# Altium PCB Sound_Sensor_v3.1.PcbDoc (part 1 of 3)
Units mm, origin at the board's own origin, x right, y up, seen from the top; angles counter-clockwise.
Board outline 69.99 x 68.25 mm, 2 copper layers (Top Layer, Bottom Layer), stack 1.448 mm thick; 83 components, 60 nets, 303 pads, 87 vias.
Unrouted connection lines stored in the file: 2.
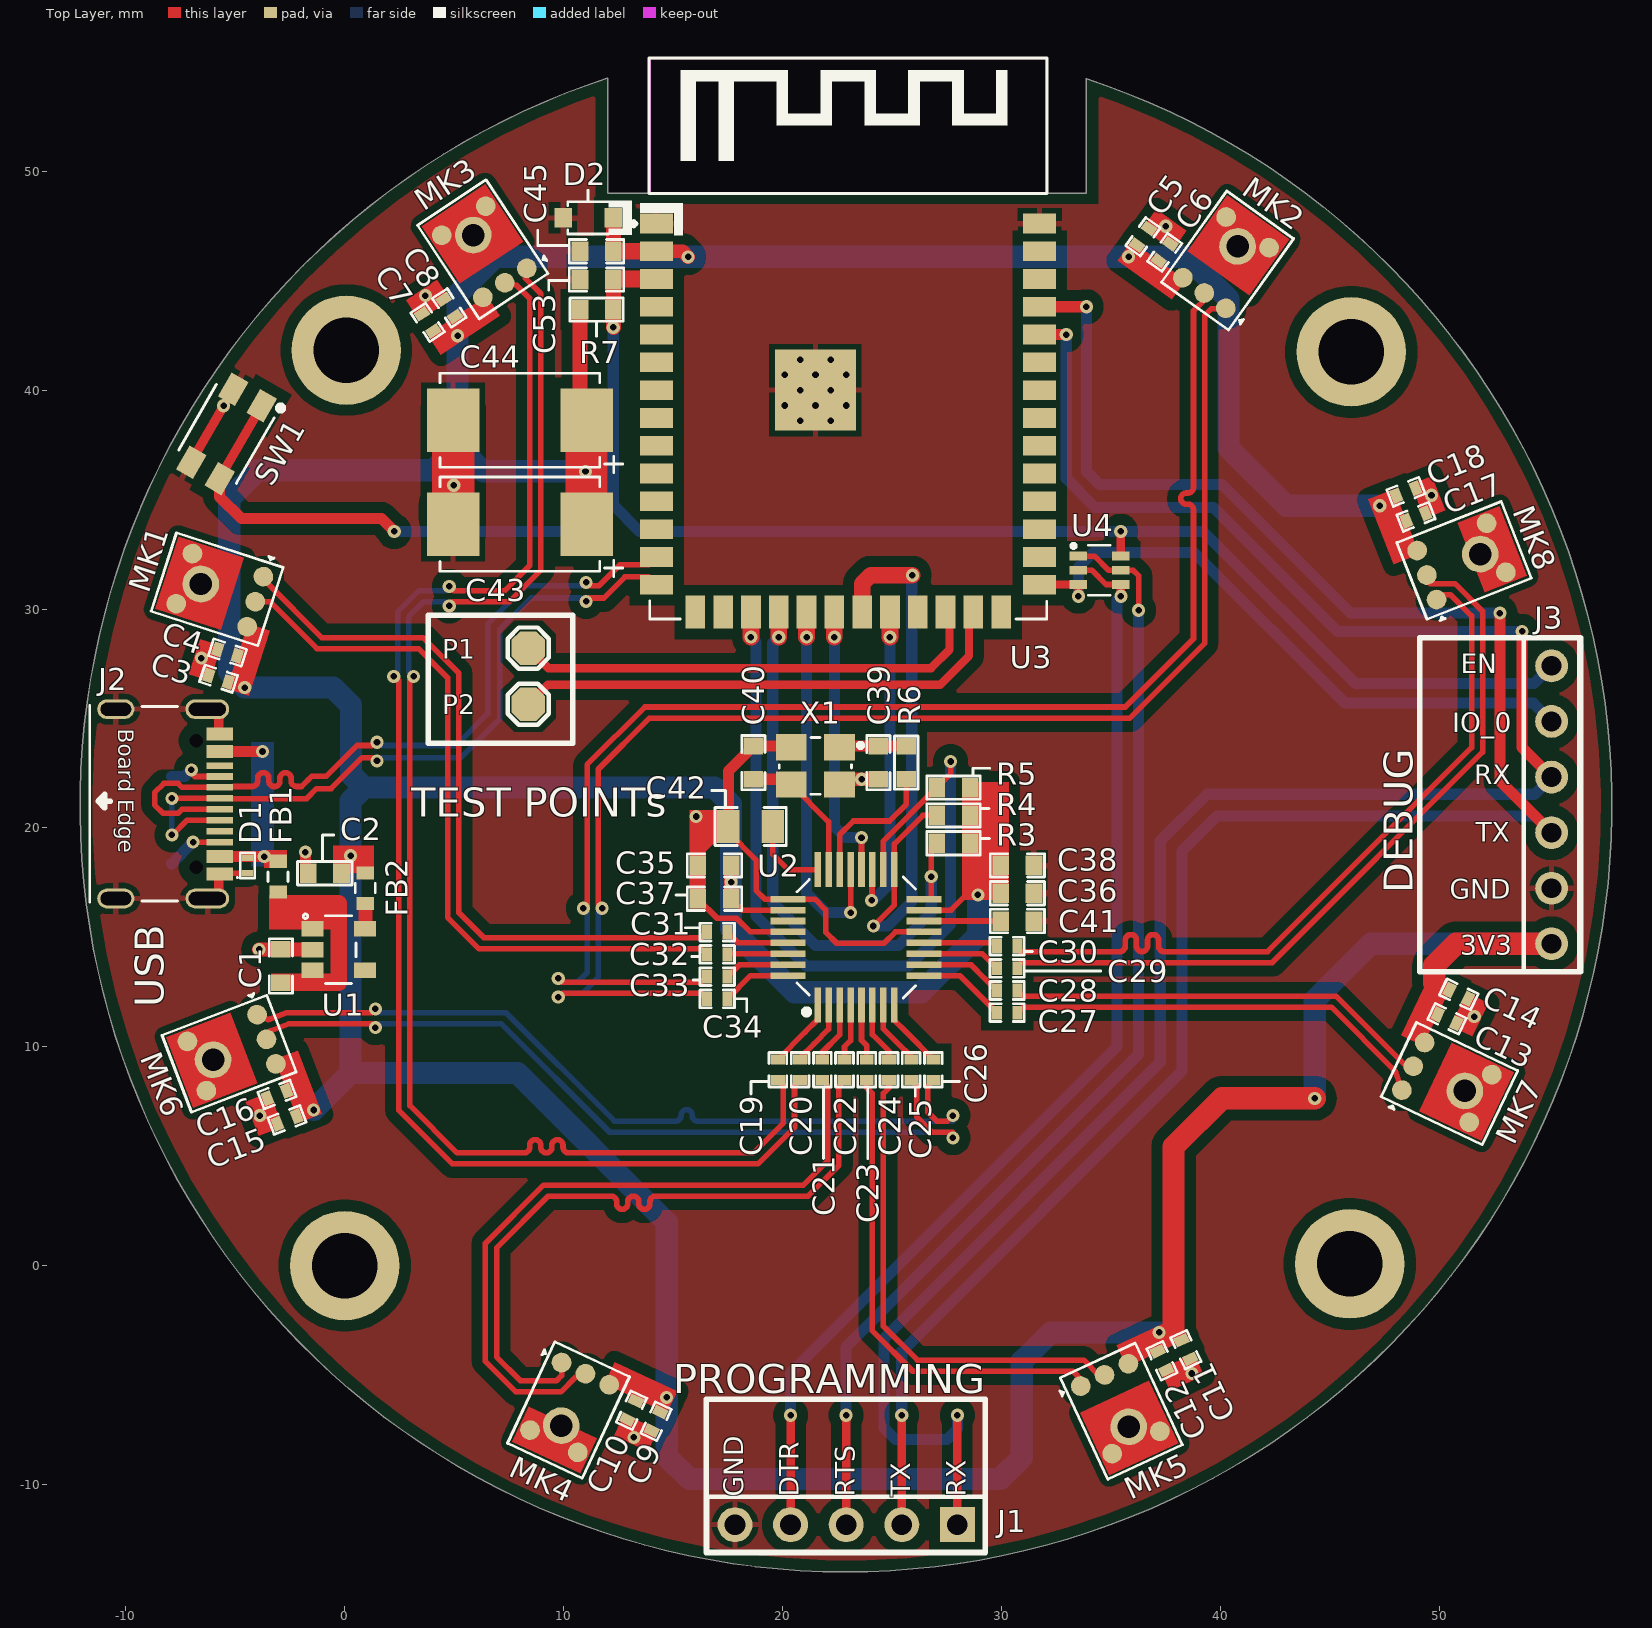
[diagram p0: Top Layer view]
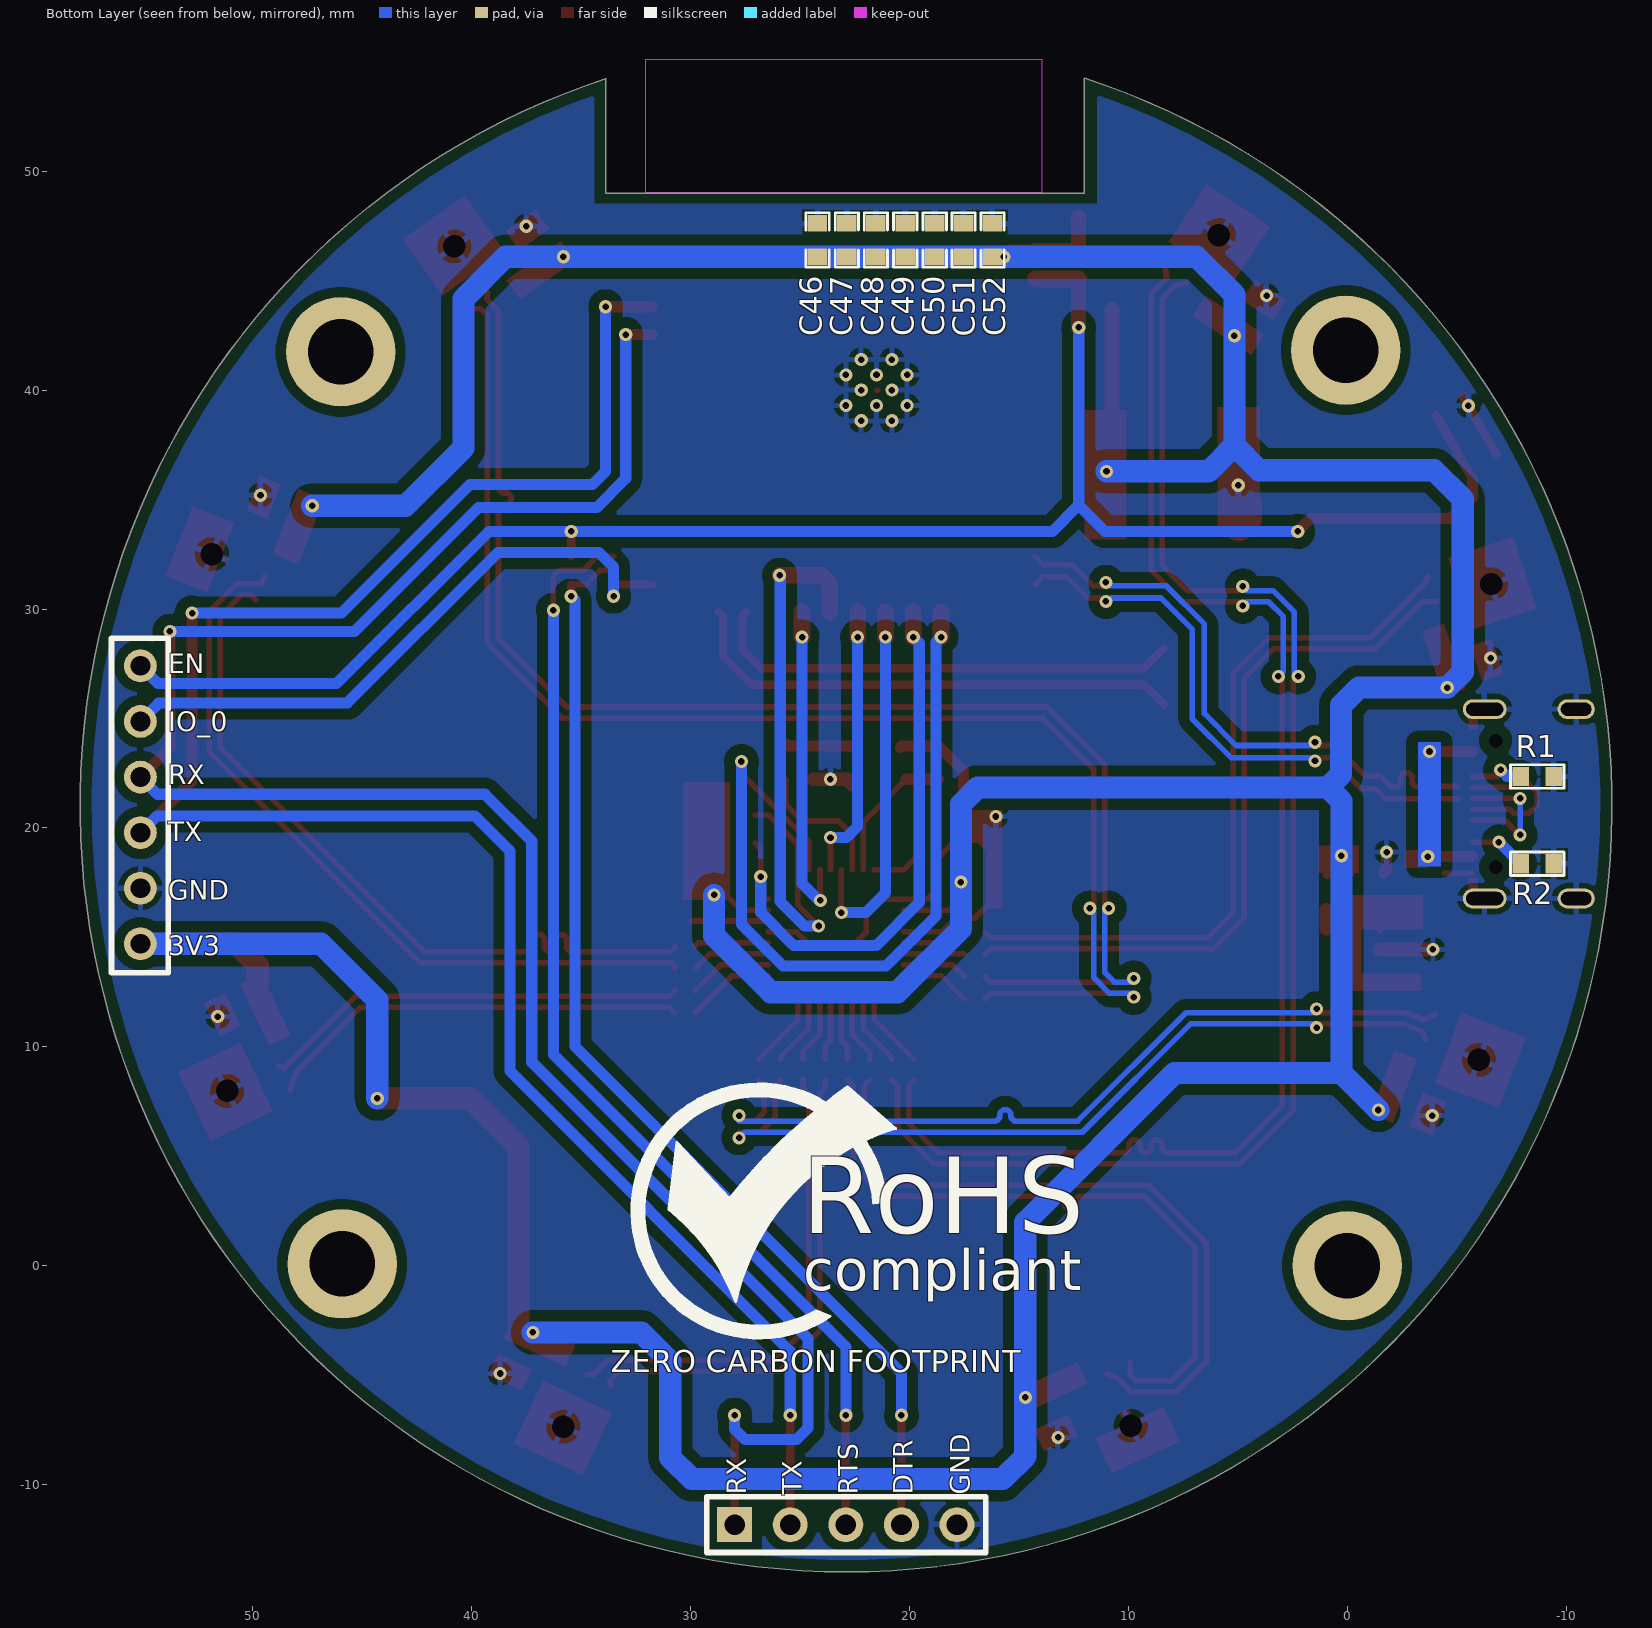
[diagram p1: Bottom Layer view, seen from below]

## Layer stack, top to bottom
Top Solder: solder mask 0.0762, Solder Resist, Dk 3.5
Top Layer: signal copper 0.254
Dielectric 1: dielectric 0.9398, FR-4, Dk 4.8
Bottom Layer: signal copper 0.254
Bottom Solder: solder mask 0.0762, Solder Resist, Dk 3.5

## Board outline
11.984,54.26 ccw(c22.903,21.007) 33.89,54.238 33.884,54.238 33.884,49.008 12.008,49.008 12.008,54.26

## Design rules (kind name [scope] priority, off if disabled: settings)
Clearance Clearance_TOP [OnLayer('Top Layer')] p1: gap=0.254 ignorepadtopadclearanceinfootprint=FALSE except(0.127: Arc-Arc Arc-Track Arc-SMDPad Track-Track Track-SMDPad SMDPad-SMDPad SMDPad-THPad SMDPad-Hole; 0.508: Arc-Fill Arc-Poly Arc-Region Track-Fill Track-Poly Track-Region SMDPad-Fill SMDPad-Poly SMDPad-Region THPad-Fill THPad-Poly THPad-Region Via-Fill Via-Poly Via-Region Fill-Fill Fill-Poly Fill-Region Poly-Poly Poly-Region Region-Region)
Clearance Clearance_BOT [OnLayer('Bottom Layer')] p2: gap=0.254 ignorepadtopadclearanceinfootprint=FALSE except(0.127: Arc-Arc Arc-Track Arc-SMDPad Track-Track Track-SMDPad SMDPad-SMDPad SMDPad-THPad SMDPad-Fill SMDPad-Poly SMDPad-Region SMDPad-Hole; 0.457: THPad-Fill THPad-Poly THPad-Region; 0.508: Arc-Fill Arc-Poly Arc-Region Track-Fill Track-Poly Track-Region Via-Fill Via-Poly Via-Region Fill-Fill Fill-Poly Fill-Region Poly-Poly Poly-Region Region-Region)
DiffPairsRouting DiffPairsRouting_1 [InDifferentialPairClass('USB_Lines')] p1: maxlimit=0.305 minlimit=0.305 mostfreqgap=0.305 toplayer_minwidth=0.254 toplayer_maxwidth=0.254 toplayer_prefwidth=0.254 bottomlayer_minwidth=0.254 bottomlayer_maxwidth=0.254 bottomlayer_prefwidth=0.254 impedanceprofiledriven=TRUE impedanceprofileid={CC3068ED-7670-4747-8044-4FC642AA30B4} impedanceprofilevalue=90.000000 maxuncoupledlength=12.7
DiffPairsRouting [InDifferentialPairClass('All Differential Pairs')] p2: maxlimit=0.254 minlimit=0.254 mostfreqgap=0.254 toplayer_minwidth=0.254 toplayer_maxwidth=0.254 toplayer_prefwidth=0.254 bottomlayer_minwidth=0.254 bottomlayer_maxwidth=0.254 bottomlayer_prefwidth=0.254 impedanceprofiledriven=TRUE impedanceprofileid={4D369393-52E4-4E5C-B60A-CF207B47102A} impedanceprofilevalue=80.000000 maxuncoupledlength=12.7
HoleSize [All] p1: absolutevalues=TRUE maxlimit=12.7 minlimit=0.025 maxpercent=80.000 minpercent=20.000
MatchedLengths "Schematic Matched Net Lengths_1" [InNetClass('USB')] p1: tolerance=0.508 checknetsindiffpair=TRUE checkdiffpairvsdiffpair=FALSE checkxsignals=FALSE checkothers=FALSE
MatchedLengths "Schematic Matched Net Lengths" [InNetClass('OUT1')] p2: tolerance=0.508 checknetsindiffpair=TRUE checkdiffpairvsdiffpair=FALSE checkxsignals=FALSE checkothers=FALSE
MaxMinImpedance "Schematic Impedance Constraint_1" [InNetClass('USB')] p1: minimum=85.00 maximum=95.00
MaxMinImpedance "Schematic Impedance Constraint" [InNetClass('OUT1')] p2: minimum=85.00 maximum=95.00
MinimumSolderMaskSliver [All] p1: minsoldermaskwidth=0
PolygonConnect [All] p1: connectstyle=Relief reliefconductorwidth=0.254 reliefentries=4 polygonreliefangle="90 Angle" airgapwidth=0.254
RoutingVias [All] p1: holewidth=0.381 width=1.016 viastyle="Through Hole" minholewidth=0.3 minwidth=0.6 maxholewidth=0.381 maxwidth=0.762
SilkToSilkClearance [All] p1: silktosilkclearance=0
SilkToSolderMaskClearance [IsPad] p1: minsilkscreentomaskgap=0 clearancetoexposedcopper=TRUE
SolderMaskExpansion [All] p1: expansion=0.102 istentingtop=FALSE
Width [All] p1: maxlimit=1.524 minlimit=0.127 preferedwidth=0.254 minimp=50.000000 maximp=50.000000 favimp=50.000000
25 further rules are at their usual default settings.

## Classes and differential pairs
differential pair class USB_Lines: USB.USB
net class USB: USB.USB_N USB.USB_P
differential pair class OUT8_Lines: MIC_OUTS.OUT8
differential pair class OUT7_Lines: MIC_OUTS.OUT7
differential pair class OUT6_Lines: MIC_OUTS.OUT6
differential pair class OUT5_Lines: MIC_OUTS.OUT5
differential pair class OUT4_Lines: MIC_OUTS.OUT4
differential pair class OUT3_Lines: MIC_OUTS.OUT3
differential pair class OUT2_Lines: MIC_OUTS.OUT2
differential pair class OUT1_Lines: MIC_OUTS.OUT1
net class OUT8: MIC_OUTS.OUT8_N MIC_OUTS.OUT8_P
net class OUT7: MIC_OUTS.OUT7_N MIC_OUTS.OUT7_P
net class OUT6: MIC_OUTS.OUT6_N MIC_OUTS.OUT6_P
net class OUT5: MIC_OUTS.OUT5_N MIC_OUTS.OUT5_P
net class OUT4: MIC_OUTS.OUT4_N MIC_OUTS.OUT4_P
net class OUT3: MIC_OUTS.OUT3_N MIC_OUTS.OUT3_P
net class OUT2: MIC_OUTS.OUT2_N MIC_OUTS.OUT2_P
net class OUT1: MIC_OUTS.OUT1_N MIC_OUTS.OUT1_P
component class U_Sensor_Sheet: C3 C4 C5 C6 C7 C8 C9 C10 C11 C12 C13 C14 C15 C16 C17 C18 MK1 MK2 MK3 MK4 MK5 MK6 MK7 MK8
component class U_Power_Section: C1 C2 FB2 U1
component class U_Controller_Sheet: C43 C44 C45 C46 C47 C48 C49 C50 C51 C52 C53 P1 P2 R7 SW1 U3 U4
component class U_Connector_Sheet: D1 FB1 J1 J2 J3 R1 R2
component class U_ADC_Section: C19 C20 C21 C22 C23 C24 C25 C26 C27 C28 C29 C30 C31 C32 C33 C34 C35 C36 C37 C38 C39 c40 C41 C42 R3 R4 R5 R6 U2 X1
differential pair USB.USB: +USB.USB_P -USB.USB_N
differential pair MIC_OUTS.OUT8: +MIC_OUTS.OUT8_P -MIC_OUTS.OUT8_N
differential pair MIC_OUTS.OUT7: +MIC_OUTS.OUT7_P -MIC_OUTS.OUT7_N
differential pair MIC_OUTS.OUT6: +MIC_OUTS.OUT6_P -MIC_OUTS.OUT6_N
differential pair MIC_OUTS.OUT5: +MIC_OUTS.OUT5_P -MIC_OUTS.OUT5_N
differential pair MIC_OUTS.OUT4: +MIC_OUTS.OUT4_P -MIC_OUTS.OUT4_N
differential pair MIC_OUTS.OUT3: +MIC_OUTS.OUT3_P -MIC_OUTS.OUT3_N
differential pair MIC_OUTS.OUT2: +MIC_OUTS.OUT2_P -MIC_OUTS.OUT2_N
differential pair MIC_OUTS.OUT1: +MIC_OUTS.OUT1_P -MIC_OUTS.OUT1_N

## Components (designator, comment, footprint, x,y, rotation, side; value= is the part's Value field where it differs from the comment)
C1 "1uF" Cap-0603 -2.921,13.691 r90 top
C2 "4.7uF" Cap-0603 -0.914,17.932 r180 top
C3 "1uF" Cap-0402 -5.766,26.822 r162 top
C4 "220pF" "Cap 0402" -5.359,28.016 r162 top
C5 "1uF" Cap-0402 36.474,47.015 r54.5 top
C6 "220pF" "Cap 0402" 37.465,46.304 r54.5 top
C7 "1uF" Cap-0402 4.775,43.764 r123.5 top
C8 "220pF" "Cap 0402" 3.785,43.104 r123.5 top
C9 "1uF" Cap-0402 14.224,-7.112 r245 top
C10 "220pF" "Cap 0402" 13.106,-6.604 r245 top
C11 "1uF" Cap-0402 38.43,-3.835 r295 top
C12 "220pF" "Cap 0402" 37.338,-4.343 r295 top
C13 "1uF" Cap-0402 50.368,11.278 r334.5 top
C14 "220pF" "Cap 0402" 50.902,12.395 r334.5 top
C15 "1uF" Cap-0402 -2.642,6.655 r201 top
C16 "220pF" "Cap 0402" -3.099,7.823 r201 top
C17 "1uF" Cap-0402 48.946,34.214 r21.5 top
C18 "220pF" "Cap 0402" 48.489,35.357 r21.5 top
C19 "100nF" Cap-0402 19.787,8.954 r90 top
C20 "100nF" Cap-0402 20.803,8.954 r90 top
C21 "100nF" Cap-0402 21.819,8.954 r90 top
C22 "100nF" Cap-0402 22.835,8.954 r90 top
C23 "100nF" Cap-0402 23.851,8.954 r90 top
C24 "100nF" Cap-0402 24.867,8.954 r90 top
C25 "100nF" Cap-0402 25.883,8.954 r90 top
C26 "100nF" Cap-0402 26.899,8.954 r90 top
C27 "100nF" Cap-0402 30.264,11.557 r180 top
C28 "100nF" Cap-0402 30.264,12.573 r180 top
C29 "100nF" Cap-0402 30.264,13.589 r180 top
C30 "100nF" Cap-0402 30.264,14.605 r180 top
C31 "100nF" Cap-0402 17.018,15.24 r0 top
C32 "100nF" Cap-0402 17.018,14.224 r0 top
C33 "100nF" Cap-0402 17.018,13.208 r0 top
C34 "100nF" Cap-0402 17.018,12.192 r0 top
C35 "1uF" Cap-0603 16.891,18.288 r180 top
C36 "1uF" Cap-0603 30.734,17.018 r0 top
C37 "100nF" Cap-0603 16.891,16.764 r180 top
C38 "100nF" Cap-0603 30.734,18.288 r0 top
C39 "18pF" Cap-0603 24.384,22.987 r90 top
C40 "18pF" Cap-0603 18.669,22.987 r270 top
C41 "100nF" Cap-0603 30.734,15.748 r0 top
C42 "220nF" Cap-0805 18.542,20.066 r0 top
C43 "680uF" Case-D 8.001,33.884 r180 top
C44 "680uF" Case-D 8.001,38.633 r180 top
C45 "10uF" Cap-0603 11.506,46.355 r180 top
C46 "1uF" Cap-0603 24.206,46.863 r90 bottom
C47 "100nF" Cap-0603 22.86,46.863 r90 bottom
C48 "1uF" Cap-0603 21.539,46.863 r90 bottom
C49 "100nF" Cap-0603 20.193,46.863 r90 bottom
C50 "100pF" Cap-0603 18.847,46.863 r90 bottom
C51 "100nF" Cap-0603 17.526,46.863 r90 bottom
C52 "100nF" Cap-0603 16.205,46.863 r90 bottom
C53 "100nF" Cap-0603 11.506,45.06 r180 top
D1 "TPD1E10B06DPYR" "X1SON - 0.45 mm max height" -4.445,18.288 r90 top
D2 "UDD32C03L01" SOD-323 11.125,47.879 r180 top
FB1 "BLM18SG121TN1D" "IND-0603 (1608 Metric)" -3.048,17.78 r270 top
FB2 "BLM18SG121TN1D" "IND-0603 (1608 Metric)" 0.94,17.247 r90 top
J1 "3-644456-5" HDR1X5 27.991,-11.837 r180 top
J2 "TYPE-C-31-M-12" TYPE-C-31-M-12_ -5.712,24.302 r270 top locked
J3 "61300611121" HDR1X6 55.144,27.407 r270 top
MK1 "SPM0687LR5H-1" SPM0687LR5H-1 -5.71,30.867 r252 top
MK2 "SPM0687LR5H-1" SPM0687LR5H-1 40.265,45.831 r144.5 top
MK3 "SPM0687LR5H-1" SPM0687LR5H-1 6.375,46.33 r213.5 top
MK4 "SPM0687LR5H-1" SPM0687LR5H-1 10.277,-6.48 r335 top
MK5 "SPM0687LR5H-1" SPM0687LR5H-1 35.436,-6.536 r25 top
MK6 "SPM0687LR5H-1" SPM0687LR5H-1 -5.167,9.733 r291 top
MK7 "SPM0687LR5H-1" SPM0687LR5H-1 50.36,8.376 r64.5 top
MK8 "SPM0687LR5H-1" SPM0687LR5H-1 51.029,32.182 r111.5 top
P1 "TEST POINT" Test-point 8.382,28.219 r0 top
P2 "TEST POINT" Test-point 8.382,25.654 r0 top
R1 "5.1K" Res-0603 -8.687,22.352 r0 bottom
R2 "5.1K" Res-0603 -8.687,18.364 r0 bottom
R3 "100K" RES-0603 27.813,19.304 r0 top
R4 "100K" RES-0603 27.813,20.574 r0 top
R5 "100K" RES-0603 27.813,21.844 r0 top
R6 "0R" Res-0603 25.654,22.987 r90 top
R7 "10K" Res-0603 11.506,43.688 r0 top
SW1 "" TS-1185EC-C-D-B -5.407,38.004 r240 top
U1 "XC6220B331MR-G" SOT-25 -0.273,14.442 r0 top locked
U2 "ADS131M08IPBSR" 32TQFP 23.36,15 r90 top locked
U3 "ESP32-S3-WROOM-1-N8R2" "41-SMD Module" 23,38.745 r0 top locked
U4 "UMH3N" UMH3N 34.493,31.775 r0 top
X1 "3TJ481920NYLBC" 3TJ481920NYLBC 21.506,22.836 r180 top

## Footprints (in the part's own frame and the unit in brackets; to place one, negate y for a bottom-side part, rotate by r counter-clockwise, add the part's x,y. Pads: shape width x height; smd on the part's side, far side on the other; paste and mask are expansions set on the pad)
3TJ481920NYLBC [mm]
  rect 1.4x1.2 smd mask+0.07: 1(-1.1,-0.85) 2(1.1,-0.85) 3(1.1,0.85) 4(-1.1,0.85)
  silkscreen extent -2.14,-1.3 1.65,1.3, body extent -1.6,-1.25 1.6,1.25, height 0.91
32TQFP [mm]
  rect 1.6x0.3 smd: 1(-3.1,1.75) 2(-3.1,1.25) 3(-3.1,0.75) 4(-3.1,0.25) 5(-3.1,-0.25) 6(-3.1,-0.75) 7(-3.1,-1.25) 8(-3.1,-1.75) 17(3.1,-1.75) 18(3.1,-1.25) 19(3.1,-0.75) 20(3.1,-0.25) 21(3.1,0.25) 22(3.1,0.75) 23(3.1,1.25) 24(3.1,1.75)
  rect 0.3x1.6 smd: 9(-1.75,-3.1) 10(-1.25,-3.1) 11(-0.75,-3.1) 12(-0.25,-3.1) 13(0.25,-3.1) 14(0.75,-3.1) 15(1.25,-3.1) 16(1.75,-3.1) 25(1.75,3.1) 26(1.25,3.1) 27(0.75,3.1) 28(0.25,3.1) 29(-0.25,3.1) 30(-0.75,3.1) 31(-1.25,3.1) 32(-1.75,3.1)
  silkscreen extent -3.53,-2.72 2.77,2.69, body extent -3.5,-3.51 3.5,3.49, height 1.25
"41-SMD Module" [mm]
  rect 1.5x0.9 smd: 1(-8.75,8.88) 2(-8.75,7.61) 3(-8.75,6.34) 4(-8.75,5.07) 5(-8.75,3.8) 6(-8.75,2.53) 7(-8.75,1.26) 8(-8.75,-0.01) 9(-8.75,-1.28) 10(-8.75,-2.55) 11(-8.75,-3.82) 12(-8.75,-5.09) 13(-8.75,-6.36) 14(-8.75,-7.63) 27(8.75,-7.63) 28(8.75,-6.36) 29(8.75,-5.09) 30(8.75,-3.82) 31(8.75,-2.55) 32(8.75,-1.28) 33(8.75,-0.01) 34(8.75,1.26) 35(8.75,2.53) 36(8.75,3.8) 37(8.75,5.07) 38(8.75,6.34) 39(8.75,7.61) 40(8.75,8.88)
  rect 0.9x1.5 smd: 15(-6.98,-8.88) 16(-5.71,-8.88) 17(-4.44,-8.88) 18(-3.17,-8.88) 19(-1.9,-8.88) 20(-0.63,-8.88) 21(0.64,-8.88) 22(1.91,-8.88) 23(3.18,-8.88) 24(4.45,-8.88) 25(5.72,-8.88) 26(6.99,-8.88)
  rect 3.7x3.7 smd: 41(-1.5,1.26)
  Keep-Out Layer region: -9.042,10.287 9.042,10.287 9.042,16.383 -9.042,16.383
  silkscreen extent -9.8,-9.2 9.09,16.43, body extent -9.01,-9.14 9.01,16.37, height 3.16
"Cap 0402" [mil]
  rect 18x25 smd mask+2.36: 1(-18.5,0) 2(18.5,0)
  silkscreen extent -31,-16 31,16, body extent -20,-10 20,10, height 19
Cap-0402 [mil]
  rect 18x25 smd mask+2.36: 1(-18.5,0) 2(18.5,0)
  silkscreen extent -31,-16 31,16, body extent -20,-10 20,10, height 19
Cap-0603 [mil]
  rect 30x35 smd mask+2.36: 1(-30,0) 2(30,0)
  silkscreen extent -49,-21 49,21, body extent -32,-16 31,16, height 34
Cap-0805 [mil] "SMD 0805"
  rect 40x60 smd mask+2.76: 1(-40,0) 2(40,0)
  silkscreen extent -64,-34 64,34, body extent -39,-25 39,25, height 30
Case-D [mm]
  rect 2.4x2.9 smd: 1(-3.05,0) 2(3.05,0)
  silkscreen extent -4.7,-2.15 3.65,2.39, body extent -3.65,-2.16 3.65,2.14, height 4
HDR1X5 [mm] "Connector; Header; 5 Position"
  rect 1.6x1.6 hole 0.95: 1(0,0)
  round 1.6 hole 0.95: 2(2.54,0) 3(5.08,0) 4(7.62,0) 5(10.16,0)
  silkscreen extent -1.27,-1.27 11.43,1.27, body extent -1.27,-1.27 11.43,1.23, height 8.65
HDR1X6 [mm] "Connector; Header; 6 Position"
  round 1.5 hole 0.9: 1(0,0) 2(2.54,0) 3(5.08,0) 4(7.62,0) 5(10.16,0) 6(12.7,0)
  silkscreen extent -1.27,-1.27 13.97,1.27, body extent -1.27,-1.24 13.97,1.25, height 8.54
"IND-0603 (1608 Metric)" [mm] "0.063\" L x 0.032\" W (1.60mm x 0.80mm)"
  rect 0.6x0.8 smd: 1(-0.7,0) 2(0.7,0)
  silkscreen extent -0.2,-0.46 0.23,0.46, body extent -0.8,-0.4 0.8,0.4, height 0.78
Res-0603 [mil]
  rect 30x35 smd: 1(-30,0) 2(30,0)
  silkscreen extent -48,-21 48,21, body extent -31,-17 31,17, height 18
RES-0603 [mil]
  rect 30x35 smd: 1(-30,0) 2(30,0)
  silkscreen extent -48,-21 48,21, body extent -31,-17 31,17, height 18
SOD-323 [mm]
  rect 0.8x0.9 smd mask+0.055: 1(-1.15,0) 2(1.15,0)
  silkscreen extent -2.01,-0.79 0.94,0.79, body extent -1.3,-0.67 1.3,0.67, height 1.1
SOT-25 [mm]
  rect 1x0.7 smd: 1(-1.2,0.95) 2(-1.2,0) 3(-1.2,-0.95) 4(1.2,-0.95) 5(1.2,0.95)
  silkscreen extent -1.63,-1.55 0.79,1.63, body extent -1.21,-1.5 1.19,1.5, height 1.1
SPM0687LR5H-1 [mm]
  round 0.9 smd: 1(-1.204,1.703) 2(-1.204,-1.703) 4(1.204,-1.703) 5(1.204,1.703) 6(0,1.703)
  round 1.676 / inner round 1.676 / far side round 0 hole 1.025: 3(0,-0.913)
  silkscreen extent -2.16,-2.69 1.88,2.44, body extent -1.88,-2.68 1.88,2.38, height 1.15
Test-point [mil]
  oct 60x60 smd: 1(0,0)
  silkscreen extent -37,-37 37,37
TS-1185EC-C-D-B [mm]
  rect 1.25x0.9 smd: 1(-1.925,0.75) 1(1.925,0.75) 2(-1.925,-0.75) 2(1.925,-0.75)
  silkscreen extent -2.39,-1.52 1.73,1.68, body extent -2.33,-1.5 2.32,1.5, height 2
TYPE-C-31-M-12_ [mm]
  rect 0.6x1.2 smd: A1/B12(0,0) A4/B9(0.8,0) B1/A12(6.4,0) B4/A9(5.6,0)
  rect 0.3x1.2 smd: A5(1.95,0) A6(2.95,0) A7(3.45,0) A8(4.45,0) B5(4.95,0) B6(3.95,0) B7(2.45,0) B8(1.45,0)
  round 0 hole 0.62 unplated: MH(0.31,-1.07) MH(6.09,-1.07)
  oval 0.9x2 hole 0.6 slot 1.7 at 90 deg: S1(7.525,-0.57) S4(-1.125,-0.57)
  oval 0.9x1.7 hole 0.6 slot 1.4 at 90 deg: S2(7.525,-4.75) S3(-1.125,-4.75)
  silkscreen extent -1.3,-5.94 7.7,-1.93, body extent -1.27,-7.32 7.67,0.58, height 3.31
UMH3N [mm]
  rect 0.8x0.4 smd: 1(-0.97,0.65) 2(-0.97,0) 3(-0.97,-0.65) 4(0.97,-0.65) 5(0.97,0) 6(0.97,0.65)
  silkscreen extent -1.25,-1.14 0.48,1.17, body extent -1.2,-1.1 1.2,1.1, height 1.08
"X1SON - 0.45 mm max height" [mm] "TVS 6A@80/20µs 14V 6V 5.5V@(MAX)"
  rect 0.3x0.5 smd: 1(-0.35,0) 2(0.35,0)
  silkscreen extent -0.58,-0.33 0.58,0.47, body extent -0.5,-0.3 0.5,0.3, height 0.45

## Part data
C1 C35 C36 C46 C48: library part CC0603KRX5R8BB105, "CAP CER 1UF 25V X5R 0603", Case Code (Imperial)=0603, Case Code (Metric)=1608, Dielectric=X5R, LCSC Part Number=C14664, Manufacturer=Yageo, Max Operating Temperature=85°C, Min Operating Temperature=-55°C, Package Quantity=1, Supplier Part Number 1=311-1445-1-ND, Tolerance=10%, Voltage Rating=25V, Capacitance=1uF, Case/Package=0603, Category="Ceramic Capacitors", ComponentLink1Description=https://datasheet.ciiva.com/176/mlccorderingcode-176785.pdf?src-supplier=Digi-Key, ComponentLink1URL=https://datasheet.ciiva.com/176/mlccorderingcode-176785.pdf?src-supplier=Digi-Key, ComponentLink2Description=https://datasheet.ciiva.com/176/mlccorderingcode-176786.pdf?src-supplier=Digi-Key, ComponentLink2URL=https://datasheet.ciiva.com/176/mlccorderingcode-176786.pdf?src-supplier=Digi-Key, ComponentLink3Description=https://datasheet.ciiva.com/176/mlccorderingcode-176787.pdf?src-supplier=Digi-Key, ComponentLink3URL=https://datasheet.ciiva.com/176/mlccorderingcode-176787.pdf?src-supplier=Digi-Key, ComponentLink4Description=https://datasheet.ciiva.com/17436/upy-gphc-x5r-4v-to-50v-12-17436952.pdf?src-supplier=Avnet+Europe, ComponentLink4URL=https://datasheet.ciiva.com/17436/upy-gphc-x5r-4v-to-50v-12-17436952.pdf?src-supplier=Avnet+Europe, ComponentLink5Description=https://datasheet.ciiva.com/7978/1525783-7978171.pdf?src-supplier=Element14, ComponentLink5URL=https://datasheet.ciiva.com/7978/1525783-7978171.pdf?src-supplier=Element14, ComponentLink6Description=https://datasheet.ciiva.com/11586/upy-gphc-x5r-4v-to-50v-12-11586318.pdf?src-supplier=Avnet, ComponentLink6URL=https://datasheet.ciiva.com/11586/upy-gphc-x5r-4v-to-50v-12-11586318.pdf?src-supplier=Avnet, Construction=Flat, Depth=0.8mm, Halogen Free="Halogen Free", Height=0.8mm, Item Type=Capacitor, Lead Free="Lead Free", Length=1.6mm, Manufacturer Part Number=CC0603KRX5R8BB105, Mount="Surface Mount", Number of Pins=2, Packaging="Tape and Reel", Pricing 1="1=0.12000, 10=0.08400, 50=0.04760, 100=0.03940, 500=0.02764, 1000=0.02288 (USD)", Radiation Hardening=No, REACH SVHC="No SVHC", RoHS=Yes, RoHS Compliant=Yes, Series=CC, Stock 1=919939, Supplier 1=Digi-Key, Termination=SMD/SMT, Thickness=0.035inch, Voltage Rating (DC)=25V, Width=0.031inch
C2: library part CC0603KRX5R7BB475, "CAP CER 4.7UF 16V X5R 0603", Case Code (Imperial)=0603, Case Code (Metric)=1608, Dielectric=X5R, LCSC Part Number=C277476, Manufacturer=Yageo, Max Operating Temperature=85°C, Min Operating Temperature=-55°C, Resistor Type=Ceramic, Supplier Part Number 1=311-1785-1-ND, Tolerance=10%, Voltage Rating=16V, Capacitance=4.7uF, Case/Package=0603, Category="Ceramic Capacitors", ComponentLink1Description=http://www.mouser.com/ds/2/447/UPY-GPHC_X5R_4V-to-50V_25-1131599.pdf?src-supplier=Mouser, ComponentLink1URL=http://www.mouser.com/ds/2/447/UPY-GPHC_X5R_4V-to-50V_25-1131599.pdf?src-supplier=Mouser, ComponentLink2Description=http://www.yageo.com/documents/recent/UPY-GPHC_X5R_4V-to-50V_25.pdf?src-supplier=Digi-Key, ComponentLink2URL=http://www.yageo.com/documents/recent/UPY-GPHC_X5R_4V-to-50V_25.pdf?src-supplier=Digi-Key, Depth=0.8mm, Halogen Free="Halogen Free", Height=0.8mm, Lead Free="Lead Free", Length=1.6mm, Manufacturer Part Number=CC0603KRX5R7BB475, Mount="Surface Mount", Packaging="Tape and Reel", Pricing 1="1=0.20000, 10=0.13800, 50=0.08280, 100=0.06990, 500=0.04784, 1000=0.04233 (USD)", RoHS=Yes, RoHS Compliant=Yes, Series=CC, Stock 1=547703, Supplier 1=Digi-Key, Termination=SMD/SMT, Thickness=0.037inch, Voltage Rating (DC)=16V, Weight=7.1E-05oz, Width=0.8mm
C3 C5 C7 C9 C11 C13 C15 C17: library part CC0402KRX5R8BB105, "CAP CER 1UF 25V X5R 0402", Case Code (Imperial)=0402, Case Code (Metric)=1005, Dielectric=X5R, LCSC Part Number=C326568, Manufacturer=Yageo, Max Operating Temperature=85°C, Min Operating Temperature=-55°C, Package Quantity=10000, Supplier Part Number 1=603-CC402KRX5R8BB105, Tolerance=10%, Voltage Rating=25V, Capacitance=1uF, Case/Package=0402, Category="Ceramic Capacitors", ComponentLink1Description=http://www.mouser.com/ds/2/447/Yageo_UPY-GP_NP0_16V-to-50V_9-358835.pdf?src-supplier=Mouser, ComponentLink1URL=http://www.mouser.com/ds/2/447/Yageo_UPY-GP_NP0_16V-to-50V_9-358835.pdf?src-supplier=Mouser, ComponentLink2Description=http://www.yageo.com/documents/recent/UPY-GPHC_X5R_4V-to-50V_25.pdf?src-supplier=Digi-Key, ComponentLink2URL=http://www.yageo.com/documents/recent/UPY-GPHC_X5R_4V-to-50V_25.pdf?src-supplier=Digi-Key, ComponentLink3Description=https://4donline.ihs.com/images/VipMasterIC/IC/YAGO/YAGO-S-A0006851646/YAGO-S-A0006851646-1.pdf?hkey=6D3A4C79FDBF58556ACFDE234799DDF0&src-supplier=Newark, ComponentLink3URL=https://4donline.ihs.com/images/VipMasterIC/IC/YAGO/YAGO-S-A0006851646/YAGO-S-A0006851646-1.pdf?hkey=6D3A4C79FDBF58556ACFDE234799DDF0&src-supplier=Newark, Halogen Free="Halogen Free", Lead Free="Lead Free", Length=0.039inch, Manufacturer Part Number=CC0402KRX5R8BB105, Mount="Surface Mount", Packaging="Tape and Reel", Pricing 1="1=0.30000, 10=0.20400, 50=0.20400, 100=0.11600, 1000=0.07200, 10000=0.05900 (USD)", RoHS=Yes, RoHS Compliant=Yes, Stock 1=91975, Supplier 1=Mouser, Termination=SMD/SMT, Thickness=0.022inch, Voltage Rating (DC)=25V, Weight=2.3E-05oz, Width=0.02inch
C4 C6 C8 C10 C12 C14 C16 C18: library part CC0402JRNPO9BN221, "CAP CER 220PF 50V C0G/NPO 0402", Case Code (Imperial)=0402, Case Code (Metric)=1005, Dielectric=C0G, Dielectric Material=Ceramic, Insulation Resistance=10GR, Manufacturer=Yageo, Max Operating Temperature=125°C, Min Operating Temperature=-55°C, Package Quantity=1, Supplier Part Number 1=6169284, Temperature Coefficient=30ppm/°C, Tolerance=10%, Voltage=50V, Capacitance=220pF, Case/Package=0402, Category="Ceramic Capacitors", ComponentLink1Description=https://datasheet.ciiva.com/11786/0900766b8079c870-11786154.pdf?src-supplier=RSComponents, ComponentLink1URL=https://datasheet.ciiva.com/11786/0900766b8079c870-11786154.pdf?src-supplier=RSComponents, ComponentLink2Description=https://datasheet.ciiva.com/7656/1132289-7656616.pdf?src-supplier=Element14, ComponentLink2URL=https://datasheet.ciiva.com/7656/1132289-7656616.pdf?src-supplier=Element14, ComponentLink3Description=https://datasheet.ciiva.com/8033/1443161-8033609.pdf?src-supplier=Element14, ComponentLink3URL=https://datasheet.ciiva.com/8033/1443161-8033609.pdf?src-supplier=Element14, ComponentLink4Description=https://datasheet.ciiva.com/8033/1443161-8033608.pdf?src-supplier=Element14, ComponentLink4URL=https://datasheet.ciiva.com/8033/1443161-8033608.pdf?src-supplier=Element14, ComponentLink5Description=https://datasheet.ciiva.com/176/mlccorderingcode-176384.pdf?src-supplier=Digi-Key, ComponentLink5URL=https://datasheet.ciiva.com/176/mlccorderingcode-176384.pdf?src-supplier=Digi-Key, ComponentLink6Description=https://datasheet.ciiva.com/176/mlccorderingcode-176383.pdf?src-supplier=Digi-Key, ComponentLink6URL=https://datasheet.ciiva.com/176/mlccorderingcode-176383.pdf?src-supplier=Digi-Key, ComponentLink7Description=https://datasheet.ciiva.com/176/mlccorderingcode-176385.pdf?src-supplier=Digi-Key, ComponentLink7URL=https://datasheet.ciiva.com/176/mlccorderingcode-176385.pdf?src-supplier=Digi-Key, ComponentLink8Description=https://datasheet.ciiva.com/17434/upy-gp-np0-16v-to-50v-8-17434343.pdf?src-supplier=Avnet+Europe, ComponentLink8URL=https://datasheet.ciiva.com/17434/upy-gp-np0-16v-to-50v-8-17434343.pdf?src-supplier=Avnet+Europe, Depth=0.5mm, Dissipation Factor=0.1%, Height=0.5mm, Lead Free="Lead Free", Length=1mm, Manufacturer Part Number=CC0402JRNPO9BN221, Mount="Surface Mount", Number of Pins=2, Packaging="Tape and Reel", Pricing 1="10000=0.00600, 100000=0.00600 (GBP)", Radiation Hardening=No, REACH SVHC="No SVHC", RoHS=Yes, RoHS Compliant=Yes, Series=CC, Stock 1=20000, Supplier 1=RSComponents, Termination=SMD/SMT, Thickness=0.022inch, Voltage Rating=50V, Width=0.02inch
C19 C20 C21 C22 C23 C24 C25 C26 C27 C28 C29 C30 C31 C32 C33 C34: library part CC0402KRX5R7BB104, "CAP CER 0.1UF 16V X5R 0402", Case Code (Imperial)=0402, Case Code (Metric)=1005, Dielectric=X5R, LCSC Part Number=C106204, Manufacturer=Yageo, Max Operating Temperature=85°C, Min Operating Temperature=-55°C, Package Quantity=1, Resistor Type=Ceramic, Supplier Part Number 1=603-CC402KRX5R7BB104, Tolerance=10%, Voltage Rating=16V, Capacitance=100nF, Case/Package=0402, Category="Ceramic Capacitors", ComponentLink1Description=https://datasheet.ciiva.com/155/mlccorderingcode-155879.pdf?src-supplier=Digi-Key, ComponentLink1URL=https://datasheet.ciiva.com/155/mlccorderingcode-155879.pdf?src-supplier=Digi-Key, ComponentLink2Description=https://datasheet.ciiva.com/155/mlccorderingcode-155878.pdf?src-supplier=Digi-Key, ComponentLink2URL=https://datasheet.ciiva.com/155/mlccorderingcode-155878.pdf?src-supplier=Digi-Key, ComponentLink3Description=https://datasheet.ciiva.com/155/mlccorderingcode-155880.pdf?src-supplier=Digi-Key, ComponentLink3URL=https://datasheet.ciiva.com/155/mlccorderingcode-155880.pdf?src-supplier=Digi-Key, ComponentLink4Description=https://datasheet.ciiva.com/11464/upy-gphc-x5r-4v-to-50v-12-11464869.pdf?src-supplier=Avnet, ComponentLink4URL=https://datasheet.ciiva.com/11464/upy-gphc-x5r-4v-to-50v-12-11464869.pdf?src-supplier=Avnet, Construction=Flat, Depth=0.5mm, Halogen Free="Halogen Free", Height=0.5mm, Lead Free="Lead Free", Length=1mm, Manufacturer Part Number=CC0402KRX5R7BB104, Mount="Surface Mount", Number of Pins=2, Packaging="Tape and Reel", Pricing 1="1=0.10000, 10=0.02300, 50=0.02300, 100=0.01100, 1000=0.00600, 10000=0.00400 (USD)", Radiation Hardening=No, REACH SVHC=Unknown, RoHS=Yes, RoHS Compliant=Yes, Series=CC, Stock 1=936792, Supplier 1=Mouser, Termination=SMD/SMT, Thickness=0.022inch, Voltage Rating (DC)=16V, Width=0.02inch
C37 C38 C41 C47 C49 C51 C52 C53: library part CC0603KRX5R9BB104, "CAP CER 0.1UF 50V X5R 0603", Case Code (Imperial)=0603, Case Code (Metric)=1608, Dielectric=X5R, LCSC Part Number=C110022, Manufacturer=Yageo, Max Operating Temperature=85°C, Min Operating Temperature=-55°C, Package Quantity=4000, Supplier Part Number 1=311-4046-1-ND, Tolerance=10%, Voltage Rating=50V, Capacitance=100nF, Case/Package=0603, Category="Ceramic Capacitors", ComponentLink1Description=http://www.mouser.com/ds/2/447/Yageo_UPY-GP_NP0_16V-to-50V_9-358835.pdf?src-supplier=Mouser, ComponentLink1URL=http://www.mouser.com/ds/2/447/Yageo_UPY-GP_NP0_16V-to-50V_9-358835.pdf?src-supplier=Mouser, ComponentLink2Description=https://www.yageo.com/upload/media/product/productsearch/datasheet/mlcc/UPY-GPHC_X5R_4V-to-50V_26.pdf?src-supplier=Digi-Key, ComponentLink2URL=https://www.yageo.com/upload/media/product/productsearch/datasheet/mlcc/UPY-GPHC_X5R_4V-to-50V_26.pdf?src-supplier=Digi-Key, ComponentLink3Description=http://www.yageo.com/exep/pages/download/literatures/ProductSelectionGuide%202014_Final_2.pdf?src-supplier=Digi-Key, ComponentLink3URL=http://www.yageo.com/exep/pages/download/literatures/ProductSelectionGuide%202014_Final_2.pdf?src-supplier=Digi-Key, Halogen Free="Halogen Free", Item Type=Capacitor, Lead Free="Lead Free", Length=0.063inch, Manufacturer Part Number=CC0603KRX5R9BB104, Mount="Surface Mount", Packaging="Tape and Reel", Pricing 1="1=0.10000, 10=0.05200, 50=0.02820, 100=0.02310, 500=0.01648, 1000=0.01294 (USD)", RoHS=Yes, Stock 1=152253, Supplier 1=Digi-Key, Termination=SMD/SMT, Thickness=0.035inch, Voltage Rating (DC)=50V, Weight=7.1E-05oz, Width=0.031inch
C39 C40: library part CC0603JRNPO9BN180, "CAP CER 18PF 50V C0G/NPO 0603", Case Code (Imperial)=0603, Case Code (Metric)=1608, Dielectric=C0G, Insulation Resistance=100GR, LCSC Part Number=C107040, Manufacturer=Yageo, Max Operating Temperature=125°C, Min Operating Temperature=-55°C, Package Quantity=1, Resistor Type=Ceramic, Supplier Part Number 1=311-1061-6-ND, Temperature Coefficient=30ppm/°C, Tolerance=5%, Voltage Rating=50V, Capacitance=18pF, Case/Package=0603, Category="Ceramic Capacitors", ComponentLink1Description=https://datasheet.ciiva.com/144/mlccorderingcode-144638.pdf?src-supplier=Digi-Key, ComponentLink1URL=https://datasheet.ciiva.com/144/mlccorderingcode-144638.pdf?src-supplier=Digi-Key, ComponentLink2Description=https://datasheet.ciiva.com/144/mlccorderingcode-144637.pdf?src-supplier=Digi-Key, ComponentLink2URL=https://datasheet.ciiva.com/144/mlccorderingcode-144637.pdf?src-supplier=Digi-Key, ComponentLink3Description=https://datasheet.ciiva.com/144/mlccorderingcode-144639.pdf?src-supplier=Digi-Key, ComponentLink3URL=https://datasheet.ciiva.com/144/mlccorderingcode-144639.pdf?src-supplier=Digi-Key, ComponentLink4Description=https://datasheet.ciiva.com/28450/1443161-28450477.pdf?src-supplier=Element14, ComponentLink4URL=https://datasheet.ciiva.com/28450/1443161-28450477.pdf?src-supplier=Element14, ComponentLink5Description=https://datasheet.ciiva.com/46430/1835847-46430152.pdf?src-supplier=Element14, ComponentLink5URL=https://datasheet.ciiva.com/46430/1835847-46430152.pdf?src-supplier=Element14, ComponentLink6Description=https://datasheet.ciiva.com/5425/upy-gp-np0-16v-to-50v-8-5425439.pdf?src-supplier=Mouser, ComponentLink6URL=https://datasheet.ciiva.com/5425/upy-gp-np0-16v-to-50v-8-5425439.pdf?src-supplier=Mouser, ComponentLink7Description=https://datasheet.ciiva.com/8033/1734582-8033733.pdf?src-supplier=Element14, ComponentLink7URL=https://datasheet.ciiva.com/8033/1734582-8033733.pdf?src-supplier=Element14, ComponentLink8Description=https://datasheet.ciiva.com/11587/upy-gp-np0-16v-to-50v-8-11587323.pdf?src-supplier=Avnet, ComponentLink8URL=https://datasheet.ciiva.com/11587/upy-gp-np0-16v-to-50v-8-11587323.pdf?src-supplier=Avnet, Depth=0.8mm, Height=0.8mm, Lead Free="Lead Free", Length=1.6mm, Manufacturer Part Number=CC0603JRNPO9BN180, Mount="Surface Mount", Number of Pins=2, Packaging="Tape and Reel", Pricing 1="1=0.10000, 10=0.04000, 50=0.02200, 100=0.01790, 500=0.01282, 1000=0.01007 (USD)", Radiation Hardening=No, REACH SVHC="No SVHC", RoHS=Yes, RoHS Compliant=Yes, Series=CC, Stock 1=936645, Supplier 1=Digi-Key, Termination=SMD/SMT, Thickness=0.035inch, Voltage Rating (DC)=50V, Width=0.031inch
C42: library part 08051C224K4T2A, "CAP CER 0.22UF 100V X7R 0805", Case/Package=0805, Dielectric=X7R, LCSC Part Number=C2176107, Manufacturer="Kyocera AVX", Max Operating Temperature=125°C, Min Operating Temperature=-55°C, Supplier Part Number 1=478-13049-1-ND, Tolerance=10%, Voltage Rating (DC)=100V, Capacitance=220nF, Category="Ceramic Capacitors", ComponentLink1Description=http://datasheets.avx.com/AutoMLCC.pdf?src-supplier=Avnet+Asia, ComponentLink1URL=http://datasheets.avx.com/AutoMLCC.pdf?src-supplier=Avnet+Asia, Contact Plating=Tin, Item Type=Capacitor, Length=2.01mm, Manufacturer Part Number=08051C224K4T2A, Mount="Surface Mount", Pricing 1="1=0.27000, 10=0.18500, 50=0.12320, 100=0.10470, 500=0.07392, 1000=0.06468 (USD)", RoHS=Yes, RoHS Compliant=Yes, Stock 1=151, Supplier 1=Digi-Key, Termination=Wraparound
C43 C44: library part 6TPE680MI, "CAP TANT POLY 680UF 6.3V 2917", Case Code (Imperial)=2917, Case Code (Metric)=7343, ESR (Equivalent Series Resistance)=18mR, LCSC Part Number=C79115, Leakage Current=428.4uA, Manufacturer=Panasonic, Max Operating Temperature=105°C, Min Operating Temperature=-55°C, Package Quantity=2000, Ripple Current=3.5A, Supplier Part Number 1=P16633CT-ND, Tolerance=20%, Voltage=6.3V, Capacitance=680uF, Case/Package=2917, Category="Tantalum Capacitors", ComponentLink1Description=https://datasheet.ciiva.com/25786/1734363-25786077.pdf?src-supplier=Farnell, ComponentLink1URL=https://datasheet.ciiva.com/25786/1734363-25786077.pdf?src-supplier=Farnell, ComponentLink2Description=https://datasheet.ciiva.com/22745/1734363-22745373.pdf?src-supplier=Element14, ComponentLink2URL=https://datasheet.ciiva.com/22745/1734363-22745373.pdf?src-supplier=Element14, ComponentLink3Description=https://datasheet.ciiva.com/24022/tpe-os-262406-24022136.pdf?src-supplier=Mouser, ComponentLink3URL=https://datasheet.ciiva.com/24022/tpe-os-262406-24022136.pdf?src-supplier=Mouser, ComponentLink4Description=https://datasheet.ciiva.com/26840/getdatasheetpartid-750514-26840938.pdf?src-supplier=Verical, ComponentLink4URL=https://datasheet.ciiva.com/26840/getdatasheetpartid-750514-26840938.pdf?src-supplier=Verical, ComponentLink5Description="New link", Construction=Flat, Depth=4.3mm, Dissipation Factor=15%, Features="General Purpose", Height=3.8mm, Height - Seated (Max)=0.157inch, Item Type=Capacitor, Lead Free="Lead Free", Length=7.3mm, Manufacturer Part Number=6TPE680MI, Mount="Surface Mount", Number of Pins=4, Packaging="Tape and Reel", Polarity=Polar, Pricing 1="1=3.55000, 10=2.86700, 50=2.50240, 100=2.18960, 500=1.66828, 1000=1.45975 (USD)", Radiation Hardening=No, Reach SVHC Compliant=Yes, RoHS=Yes, RoHS Compliant=Yes, Series="POSCAP™ TPE", Stock 1=9647, Supplier 1=Digi-Key, Termination=SMD/SMT, Voltage Rating=6.3V, Voltage Rating (DC)=6.3V, Width=4.3mm
C45: library part C1608X5R1E106M080AC, "CAP CER 10UF 25V X5R 0603", Case Code (Imperial)=0603, Case Code (Metric)=1608, Dielectric=X5R, Dielectric Material=Ceramic, LCSC Part Number=C2168289, Manufacturer=TDK, Max Operating Temperature=85°C, Min Operating Temperature=-55°C, Package Quantity=1, Supplier Part Number 1=445-9015-1-ND, Tolerance=20%, Voltage Rating=25V, Capacitance=10uF, Case/Package=0603, Composition=Ceramic, Depth=0.8mm, Height=0.8mm, Lead Free="Lead Free", Length=1.6mm, Manufacturer Part Number=C1608X5R1E106M080AC, Mount="Surface Mount", Packaging="Tape and Reel", Pricing 1="1=0.96, 10=0.704, 100=0.483, 500=0.38238, 1000=0.322 (USD)", REACH SVHC="No SVHC", Stock 1=61681, Supplier 1=Digi-Key, Termination=SMD/SMT, Thickness=0.039inch, Voltage Rating (DC)=25V, Weight=7.1E-05oz, Width=0.8mm
C50: library part CC0603JRNPO9BN101, "CAP CER 100PF 50V C0G/NPO 0603", Case Code (Imperial)=0603, Case Code (Metric)=1608, Dielectric=C0G, Insulation Resistance=100GR, LCSC Part Number=C14665, Manufacturer=Yageo, Max Operating Temperature=125°C, Min Operating Temperature=-55°C, Package Quantity=1, Resistor Type=Ceramic, Temperature Coefficient=30ppm/°C, Tolerance=5%, Voltage=50V, Capacitance=100pF, Case/Package=0603, Category="Ceramic Capacitors", ComponentLink1Description=https://datasheet.ciiva.com/11786/0900766b8079c870-11786060.pdf?src-supplier=RSComponents, ComponentLink1URL=https://datasheet.ciiva.com/11786/0900766b8079c870-11786060.pdf?src-supplier=RSComponents, ComponentLink2Description=https://datasheet.ciiva.com/7978/1443161-7978127.pdf?src-supplier=Element14, ComponentLink2URL=https://datasheet.ciiva.com/7978/1443161-7978127.pdf?src-supplier=Element14, ComponentLink3Description=https://datasheet.ciiva.com/28450/1443161-28450457.pdf?src-supplier=Element14, ComponentLink3URL=https://datasheet.ciiva.com/28450/1443161-28450457.pdf?src-supplier=Element14, ComponentLink4Description=https://datasheet.ciiva.com/46430/1835847-46430151.pdf?src-supplier=Element14, ComponentLink4URL=https://datasheet.ciiva.com/46430/1835847-46430151.pdf?src-supplier=Element14, ComponentLink5Description=https://datasheet.ciiva.com/144/mlccorderingcode-144629.pdf?src-supplier=Digi-Key, ComponentLink5URL=https://datasheet.ciiva.com/144/mlccorderingcode-144629.pdf?src-supplier=Digi-Key, ComponentLink6Description=https://datasheet.ciiva.com/144/mlccorderingcode-144628.pdf?src-supplier=Digi-Key, ComponentLink6URL=https://datasheet.ciiva.com/144/mlccorderingcode-144628.pdf?src-supplier=Digi-Key, ComponentLink7Description=https://datasheet.ciiva.com/144/mlccorderingcode-144630.pdf?src-supplier=Digi-Key, ComponentLink7URL=https://datasheet.ciiva.com/144/mlccorderingcode-144630.pdf?src-supplier=Digi-Key, ComponentLink8Description=https://datasheet.ciiva.com/11464/upy-gp-np0-16v-to-50v-8-11464725.pdf?src-supplier=Avnet, ComponentLink8URL=https://datasheet.ciiva.com/11464/upy-gp-np0-16v-to-50v-8-11464725.pdf?src-supplier=Avnet, ComponentLink9Description=https://datasheet.ciiva.com/26829/getdatasheetpartid-403525-26829372.pdf?src-supplier=Verical, ComponentLink9URL=https://datasheet.ciiva.com/26829/getdatasheetpartid-403525-26829372.pdf?src-supplier=Verical, Depth=0.8mm, Height=0.8mm, Lead Free="Lead Free", Length=1.6mm, Manufacturer Part Number=CC0603JRNPO9BN101, Mount="Surface Mount", Number of Pins=2, Packaging="Tape and Reel", Pricing 1="1=0.06030, 10=0.04400, 25=0.02170, 100=0.01580, 250=0.01330, 500=0.01300, 1000=0.01150, 3000=0.01010, 6000=0.00680 (USD)", Radiation Hardening=No, REACH SVHC=Unknown, RoHS=Yes, RoHS Compliant=Yes, Series=CC, Stock 1=10744, Supplier 1="Arrow Electronics", Supplier Part Number 1=CC0603JRNPO9BN101, Termination=SMD/SMT, Thickness=0.035inch, Voltage Rating=50V, Voltage Rating (DC)=50V, Width=0.8mm
D1: "DIODE TVS SMD 5.5V 5A 90W", Breakdown Voltage=6V, Capacitance=12pF, Case/Package=SON, Clamping Voltage=14V, Leakage Current=100nA, Manufacturer="Texas Instruments", Max Operating Temperature=125°C, Min Operating Temperature=-40°C, Package Quantity=1, Peak Pulse Current=5A, Peak Pulse Power=90W, Power Line Protection=No, Resistor Type=Zener, Reverse Standoff Voltage=5.5V, Supplier Part Number 1=595-TPD1E10B06DPYR, Test Current=1mA, Category="TVS Diodes", ComponentLink1Description=https://datasheet.ciiva.com/22691/1877100-22691786.pdf?src-supplier=Element14, ComponentLink1URL=https://datasheet.ciiva.com/22691/1877100-22691786.pdf?src-supplier=Element14, ComponentLink2Description=https://datasheet.ciiva.com/46384/1877100-46384054.pdf?src-supplier=Element14, ComponentLink2URL=https://datasheet.ciiva.com/46384/1877100-46384054.pdf?src-supplier=Element14, ComponentLink3Description=https://datasheet.ciiva.com/2961/tpd1e10b06-2961245.pdf?src-supplier=Digi-Key, ComponentLink3URL=https://datasheet.ciiva.com/2961/tpd1e10b06-2961245.pdf?src-supplier=Digi-Key, ComponentLink4Description=https://datasheet.ciiva.com/6574/tpd1e10b06-6574654.pdf?src-supplier=Digi-Key, ComponentLink4URL=https://datasheet.ciiva.com/6574/tpd1e10b06-6574654.pdf?src-supplier=Digi-Key, ComponentLink5Description=https://datasheet.ciiva.com/2961/tpd1e10b06-2961246.pdf?src-supplier=Digi-Key, ComponentLink5URL=https://datasheet.ciiva.com/2961/tpd1e10b06-2961246.pdf?src-supplier=Digi-Key, ComponentLink6Description=https://datasheet.ciiva.com/14195/tpd1e10b06-14195178.pdf?src-supplier=Avnet, ComponentLink6URL=https://datasheet.ciiva.com/14195/tpd1e10b06-14195178.pdf?src-supplier=Avnet, Contact Plating=Gold, Diode Type=ZENER, Direction=Bidirectional, Element Configuration=Single, ESD Protection=Yes, Height=0.35mm, Interface=GPIO, Lead Free="Lead Free", Length=1.1mm, Manufacturer Part Number=TPD1E10B06DPYR, Max Reverse Leakage Current=100nA, Min Breakdown Voltage=6V, Number of Bidirectional Channels=1, Number of Channels=1, Number of Pins=2, Packaging="Tape and Reel", Pricing 1="1=0.39000, 10=0.29800, 50=0.29800, 100=0.18600, 500=0.12700, 1000=0.09800, 2500=0.08300, 10000=0.07500 (USD)", Radiation Hardening=No, REACH SVHC="No SVHC", RoHS=Yes, RoHS Compliant=Yes, Series=-, Supplier 1=Mouser, Width=0.7mm, Working Voltage=5.5V
D2: "15V 19A 3.3V 4V Bidirectional SOD-323 ESD Protection Devices ROHS", LCSC Part Number=C78439, Manufacturer=Brightking, ComponentLink1Description=LCSC, ComponentLink1URL=https://lcsc.com/product-detail/span-style-background-color-ff0-ESD-span-Protection-Devices_Brightking-Elec-TAIWAN-UDD32C03L01_C78439.html, Item Type="ESD Diode", Manufacturer Part Number=UDD32C03L01
FB1 FB2: "FERRITE BEAD 120 OHM 0603 1LN", Case Code (Imperial)=0603, Case Code (Metric)=1608, Current Rating=3A, DC Resistance (DCR)=25mR, Frequency=100MHz, LCSC Part Number=C113030, Manufacturer=Murata, Max Operating Temperature=125°C, Min Operating Temperature=-55°C, Package Quantity=1, Tolerance=25%, Case/Package=0603, Category="Ferrite Beads and Chips", ComponentLink1Description=https://datasheet.ciiva.com/1012/l0110s0100blm18s-1012624.pdf?src-supplier=Digi-Key, ComponentLink1URL=https://datasheet.ciiva.com/1012/l0110s0100blm18s-1012624.pdf?src-supplier=Digi-Key, ComponentLink2Description=https://datasheet.ciiva.com/11799/0900766b811b5866-11799181.pdf?src-supplier=RSComponents, ComponentLink2URL=https://datasheet.ciiva.com/11799/0900766b811b5866-11799181.pdf?src-supplier=RSComponents, ComponentLink3Description=https://datasheet.ciiva.com/18093/getdatasheetpartid-295885-18093249.pdf?src-supplier=Verical, ComponentLink3URL=https://datasheet.ciiva.com/18093/getdatasheetpartid-295885-18093249.pdf?src-supplier=Verical, ComponentLink4Description=https://datasheet.ciiva.com/41449/001171723-da-01-en-chip-drossel0603-120r-3000ma-1-6x0-8mm-41449353.pdf?src-supplier=Conrad, ComponentLink4URL=https://datasheet.ciiva.com/41449/001171723-da-01-en-chip-drossel0603-120r-3000ma-1-6x0-8mm-41449353.pdf?src-supplier=Conrad, ComponentLink5Description=https://datasheet.ciiva.com/41449/001172312-da-01-en-drossel-0603-120r-1-6x0-8mm-10000st-41449675.pdf?src-supplier=Conrad, ComponentLink5URL=https://datasheet.ciiva.com/41449/001172312-da-01-en-drossel-0603-120r-1-6x0-8mm-10000st-41449675.pdf?src-supplier=Conrad, ComponentLink6Description=https://datasheet.ciiva.com/8021/5151-8021511.pdf?src-supplier=Element14, ComponentLink6URL=https://datasheet.ciiva.com/8021/5151-8021511.pdf?src-supplier=Element14, ComponentLink7Description=https://datasheet.ciiva.com/8021/5151-8021512.pdf?src-supplier=Element14, ComponentLink7URL=https://datasheet.ciiva.com/8021/5151-8021512.pdf?src-supplier=Element14, ComponentLink8Description=https://datasheet.ciiva.com/14122/blm-series-eng-tds-14122906.pdf?src-supplier=Distrelec, ComponentLink8URL=https://datasheet.ciiva.com/14122/blm-series-eng-tds-14122906.pdf?src-supplier=Distrelec, ComponentLink9Description=https://datasheet.ciiva.com/1012/l0110s0100blm18s-1012623.pdf?src-supplier=Digi-Key, ComponentLink9URL=https://datasheet.ciiva.com/1012/l0110s0100blm18s-1012623.pdf?src-supplier=Digi-Key, ComponentLink10Description=https://datasheet.ciiva.com/1012/l0110s0100blm18s-1012625.pdf?src-supplier=Digi-Key, ComponentLink10URL=https://datasheet.ciiva.com/1012/l0110s0100blm18s-1012625.pdf?src-supplier=Digi-Key, ComponentLink11Description=https://datasheet.ciiva.com/16395/l0110s0100blm18s-16395498.pdf?src-supplier=Future+Electronics, ComponentLink11URL=https://datasheet.ciiva.com/16395/l0110s0100blm18s-16395498.pdf?src-supplier=Future+Electronics, Core Material=Ferrite, DC Resistance-Max=25mR, Depth=0.8mm, Height=0.8mm, Impedance=120R, Item Type="Ferrite Bead", Lead Free="Lead Free", Length=1.6mm, Manufacturer Part Number=BLM18SG121TN1D, Material=Steel,Ferrite, Max Current Rating=3A, Max DC Current=3A, Number of Circuits=1, Number of Lines=1, Number of Pins=2, Packaging="Tape and Reel", Pricing 1="1=0.12640, 10=0.08350, 25=0.07210, 100=0.05150, 250=0.04730, 500=0.04110, 1000=0.03420, 3000=0.03360, 6000=0.03320, 15000=0.03270, 30000=0.03200, 75000=0.03150 (USD)", Reach SVHC Compliant=Yes, RoHS=Yes, RoHS Compliant=Yes, Series=BLM18S, Shielding=Unshielded, Stock 1=82612, Supplier 1="Arrow Electronics", Supplier Part Number 1=BLM18SG121TN1D, Termination=SMD/SMT, Test Frequency=100MHz, Width=0.8mm
J1: "05P MTA100 HDR ASSY (NARROW)", Color=Natural, Contact Current Rating=5A, Contact Resistance=6mR, Flammability Rating="UL94 V-0", Manufacturer="TE Connectivity", Max Operating Temperature=221°C, Max Voltage Rating (AC)=250V, Min Operating Temperature=-67°C, Package Quantity=500, Supplier Part Number 1=A31115-ND, Approvals=CSA, Backwall/Post Interruptions="No (Without)", Category=Connectors, ComponentLink1Description=https://datasheet.ciiva.com/16307/3-644456-5-16307486.pdf?src-supplier=Future+Electronics, ComponentLink1URL=https://datasheet.ciiva.com/16307/3-644456-5-16307486.pdf?src-supplier=Future+Electronics, ComponentLink2Description=https://datasheet.ciiva.com/3118/eng-ds-82056-mta-0608-3118213.pdf?src-supplier=Avnet, ComponentLink2URL=https://datasheet.ciiva.com/3118/eng-ds-82056-mta-0608-3118213.pdf?src-supplier=Avnet, ComponentLink3Description=https://datasheet.ciiva.com/30250/8852eng-ds-82056-mta-0608-30250984.pdf?src-supplier=Onlinecomponents.com, ComponentLink3URL=https://datasheet.ciiva.com/30250/8852eng-ds-82056-mta-0608-30250984.pdf?src-supplier=Onlinecomponents.com, ComponentLink4Description=https://datasheet.ciiva.com/14641/70087179-14641766.pdf?src-supplier=Allied+Electronics, ComponentLink4URL=https://datasheet.ciiva.com/14641/70087179-14641766.pdf?src-supplier=Allied+Electronics, ComponentLink5Description=https://datasheet.ciiva.com/709/eng-cd-644456-d2-709724.pdf?src-supplier=Digi-Key, ComponentLink5URL=https://datasheet.ciiva.com/709/eng-cd-644456-d2-709724.pdf?src-supplier=Digi-Key, Connector System=Wire-to-Board, Connector Type=Plug,Header,Pin, Contact Finish - Mating=TIN, Contact Gender=Male, Contact Material="Copper Alloy", Contact Mating Length=7.49mm, Contact Plating=Tin,Matte, Contact Retention="No (Without)", Contact Shape=Square, Contact Style=Straight, Contact Type="Male Pin", Current Rating=5A, Depth=2.33mm, ELV=Compliant, Gender=Male, Height=10.03mm, Housing Color=Natural, Housing Material=Polyester, Insulation Color=Natural, Insulation Material=Thermoplastic, Lead Free="Lead Free", Length=12.4mm, Manufacturer Part Number=3-644456-5, Mating Alignment="No (Without)", Mating Retention="No (Without)", Mount="Through Hole", Number of Contacts=5, Number of Positions=5, Number of Rows=1, Orientation=Straight, Packaging=Bag, PCB Mount Alignment="No (Without)", PCB Mount Retention=Without, PCB Mounting Orientation=Vertical, PCB Thickness=0.063inch, Pitch=2.54mm, Plating Thickness=1.27um, Pricing 1="1=0.45000, 10=0.39200, 100=0.32330, 500=0.28114, 1000=0.23195, 5000=0.20383, 10000=0.18978 (USD)", Radiation Hardening=No, REACH SVHC=Unknown, RoHS=Yes, Sealable="No (Without)", Series=MTA-100, Shrouded="No (Without)", Stock 1=30835, Strain Relief="No (Without)", Supplier 1=Digi-Key, Tail Length=0.11inch, Termination=Solder, Underplate Material=Nickel, Voltage Rating=250V, Voltage Rating (AC)=250V
J2: "250mA 1 16 Female Type-C SMD USB Connectors ROHS", LCSC Part Number=C165948, Manufacturer="Korean Hroparts Elec", ComponentLink1Description=LCSC, ComponentLink1URL=https://www.lcsc.com/product-detail/USB-Connectors_Korean-Hroparts-Elec-TYPE-C-31-M-12_C165948.html, Item Type="USB Connector", Manufacturer Part Number=TYPE-C-31-M-12
J3: library part e-50004, "CONN HEADER VERT 6POS 2.54MM", Color=Black, Current Rating=3A, Manufacturer="Wurth Electronics", Max Operating Temperature=125°C, Min Operating Temperature=-40°C, Supplier Part Number 1=732-5319-ND, Voltage Rating=250V, ComponentLink1Description=http://www.farnell.com/cad/1737268.pdf?src-supplier=Element14, ComponentLink1URL=http://www.farnell.com/cad/1737268.pdf?src-supplier=Element14, ComponentLink2Description=https://katalog.we-online.de/em/datasheet/6130xx11121.pdf?src-supplier=Digi-Key, ComponentLink2URL=https://katalog.we-online.de/em/datasheet/6130xx11121.pdf?src-supplier=Digi-Key, ComponentLink3Description=http://www.mouser.com/ds/2/445/6130xx11121-538006.pdf?src-supplier=Mouser, ComponentLink3URL=http://www.mouser.com/ds/2/445/6130xx11121-538006.pdf?src-supplier=Mouser, Connector Type="Male Pin", Contact Gender=Male, Contact Material="Copper Alloy,Copper", Contact Mating Length=0.236inch, Contact Plating=Gold, Gender=Male, Housing Material=PBT, Lead Free="Lead Free", Manufacturer Part Number=61300611121, Mount="Through Hole", Number of Contacts=6, Number of Positions=6, Number of Rows=1, Packaging=Bulk, Pitch=0.1inch, Pricing 1="1=0.33, 10=0.279, 25=0.232, 50=0.194, 100=0.176, 1000=0.16 (USD)", REACH SVHC=Unknown, Stock 1=14573, Supplier 1=Digi-Key, Termination="Through Hole"
MK1 MK2 MK3 MK4 MK5 MK6 MK7 MK8: "WINFREY MIC HI SNR/AOP BOT PORT", Manufacturer=Knowles, Operating Supply Current=285uA, Supplier Part Number 1=423-SPM0687LR5H-1CT-ND, Category=Microphones, ComponentLink1Description=https://media.digikey.com/pdf/Data%20Sheets/Knowles%20Acoustics%20PDFs/SPM0687LR5H-1.pdf?src-supplier=Digi-Key, ComponentLink1URL=https://media.digikey.com/pdf/Data%20Sheets/Knowles%20Acoustics%20PDFs/SPM0687LR5H-1.pdf?src-supplier=Digi-Key, Item Type=Microphone, Manufacturer Part Number=SPM0687LR5H-1, Output Type=Analog, Packaging="Cut Tape", Pricing 1="1=2.12000, 10=1.75900, 25=1.62560, 50=1.52880, 100=1.43540, 500=1.23212, 1000=1.17611 (USD)", RoHS=Yes, Shape=Rectangular, Stock 1=116440, Supplier 1=Digi-Key, Termination=Solder
P1 P2: "Test Point ON"
R1 R2: library part RC0603FR-075K1L, "RES 5.1K OHM 1% 1/10W 0603", Case Code (Imperial)=0603, Case Code (Metric)=1608, LCSC Part Number=C105580, Manufacturer=Yageo, Max Operating Temperature=155°C, Max Power Dissipation=100mW, Min Operating Temperature=-55°C, Package Quantity=1, Resistance=5.1kR, Resistance Tolerance=1%, Resistor Type="Thick Film", Temperature Coefficient=100ppm/°C, Voltage Rating=50V, Case/Package=0603, Category="Chip SMD Resistors", ComponentLink1Description=https://datasheet.ciiva.com/46395/443971-46395016.pdf?src-supplier=Element14, ComponentLink1URL=https://datasheet.ciiva.com/46395/443971-46395016.pdf?src-supplier=Element14, ComponentLink2Description=https://datasheet.ciiva.com/2454/pyu-r-int-thick-7-2454046.pdf?src-supplier=Digi-Key, ComponentLink2URL=https://datasheet.ciiva.com/2454/pyu-r-int-thick-7-2454046.pdf?src-supplier=Digi-Key, ComponentLink3Description=https://datasheet.ciiva.com/2454/pyu-r-int-thick-7-2454047.pdf?src-supplier=Digi-Key, ComponentLink3URL=https://datasheet.ciiva.com/2454/pyu-r-int-thick-7-2454047.pdf?src-supplier=Digi-Key, ComponentLink4Description=https://datasheet.ciiva.com/2454/pyu-r-int-thick-7-2454045.pdf?src-supplier=Digi-Key, ComponentLink4URL=https://datasheet.ciiva.com/2454/pyu-r-int-thick-7-2454045.pdf?src-supplier=Digi-Key, ComponentLink5Description=https://datasheet.ciiva.com/15189/getdatasheetpartid-326732-15189786.pdf?src-supplier=Verical, ComponentLink5URL=https://datasheet.ciiva.com/15189/getdatasheetpartid-326732-15189786.pdf?src-supplier=Verical, Construction=Rectangular, Depth=0.8mm, Features="Moisture Resistant", Height=0.022inch, Item Type=Resistor, Lead Free="Lead Free", Length=0.063inch, Manufacturer Part Number=RC0603FR-075K1L, Military Standard=Not, Number of Pins=2, Number of Terminations=2, Packaging="Tape and Reel", Power Rating=100mW, Pricing 1="5000=0.00133, 10000=0.00131, 20000=0.00127 (USD)", Reach SVHC Compliant=Yes, RoHS=Yes, RoHS Compliant=Yes, Series=RC, Size Code=0603, Stock 1=100000, Supplier 1=Avnet, Supplier Part Number 1=RC0603FR-075K1L, Termination=SMD/SMT, Tolerance=1%, Voltage Rating (DC)=50V, Width=0.031inch